# Altium PCB PCB1.PcbDoc
Units mm, origin at the board's own origin, x right, y up, seen from the top; angles counter-clockwise.
Board outline 97 x 70 mm, 2 copper layers (Top Layer, Bottom Layer); 47 components, 61 nets, 268 pads, 166 vias.
Unrouted connection lines stored in the file: 28.
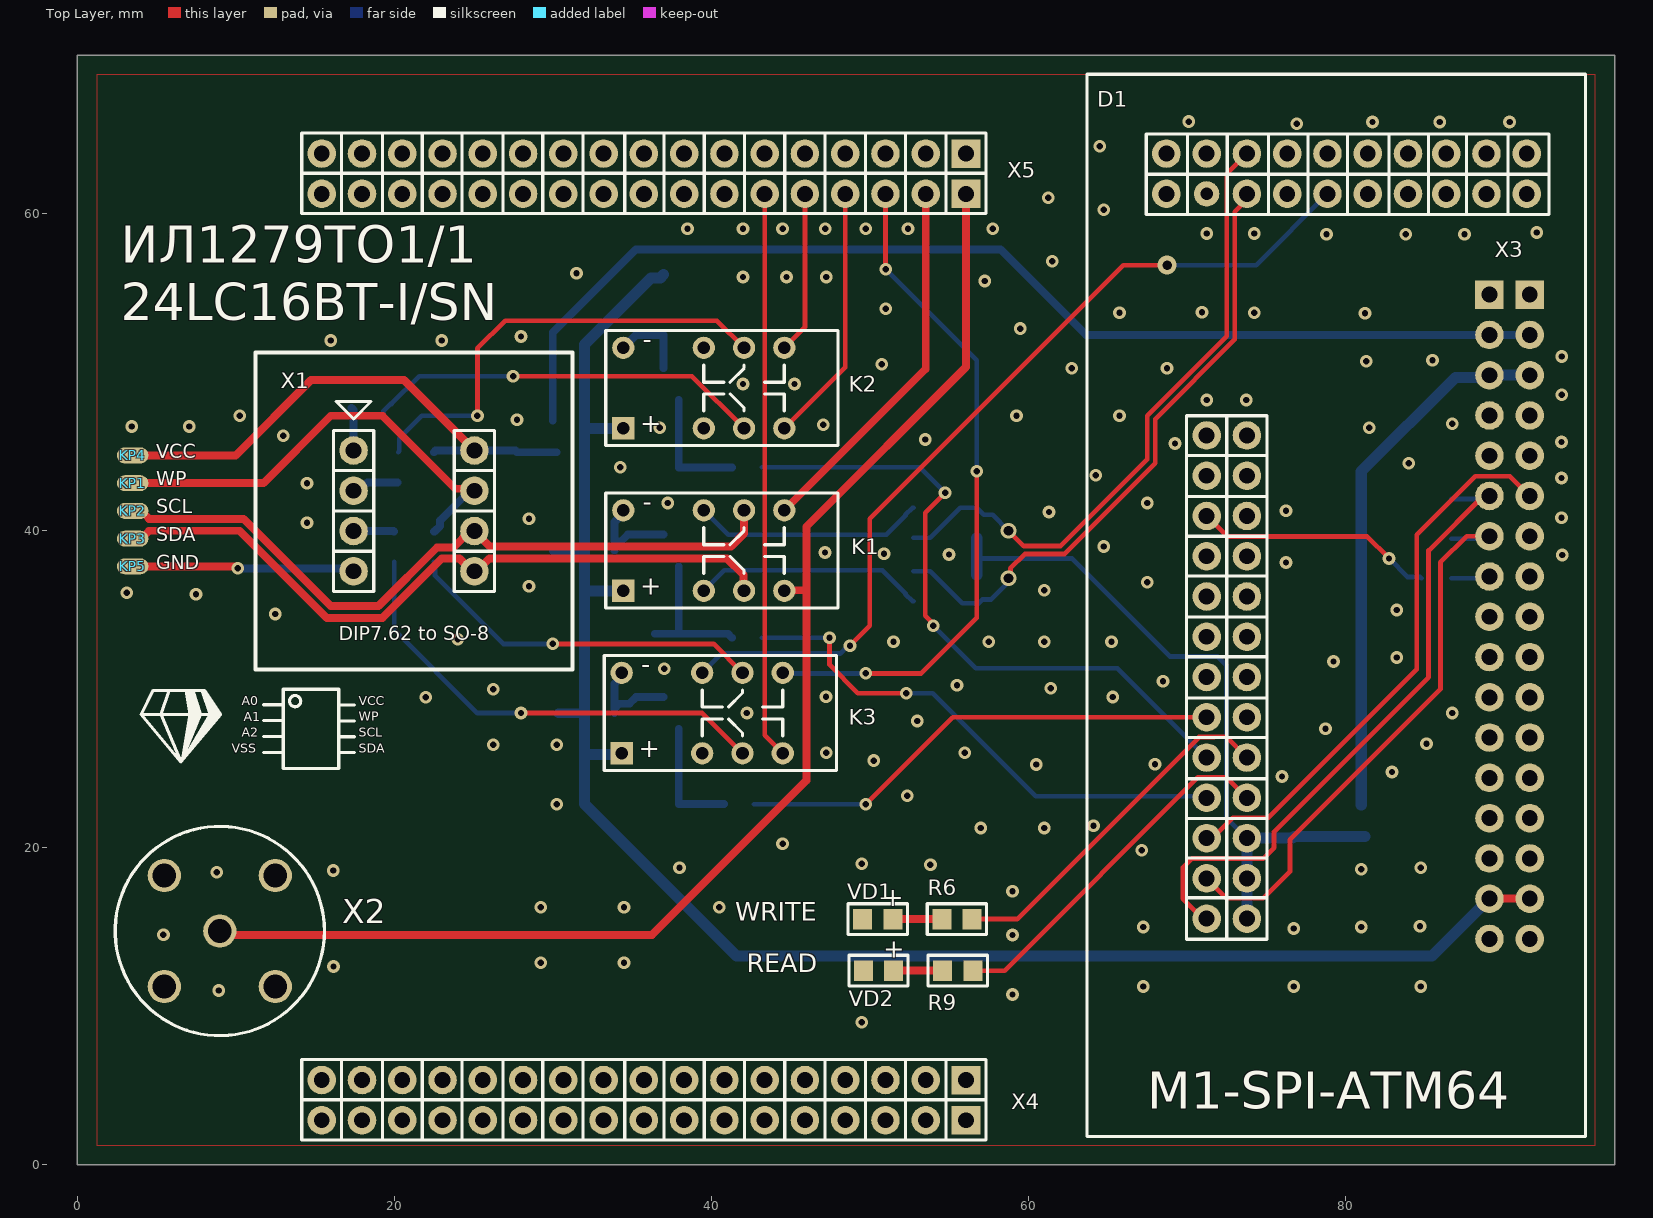
[diagram p0: Top Layer view]
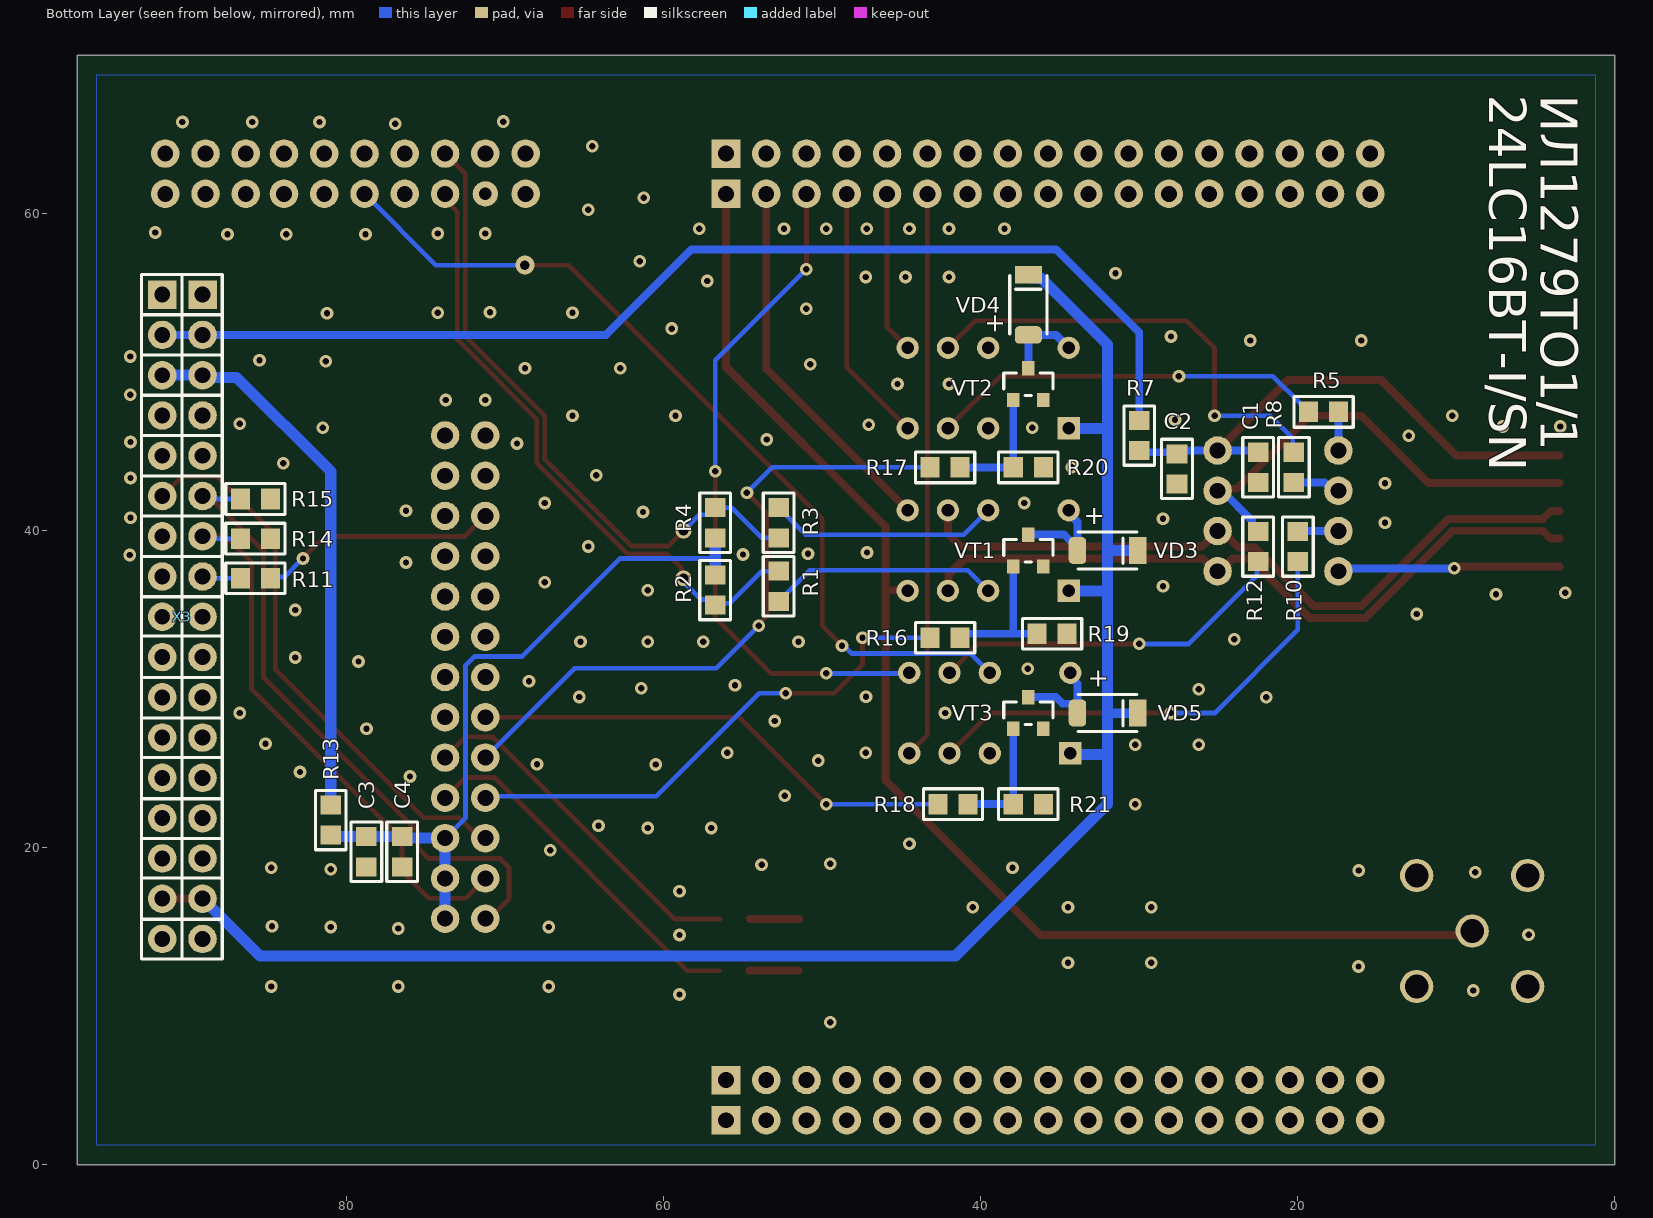
[diagram p1: Bottom Layer view, seen from below]

## Layer stack, top to bottom
Top Solder: solder mask 0.0102, Solder Resist, Dk 3.5
Top Layer: signal copper 0.0356
Dielectric 1: dielectric 0.32, FR-4, Dk 4.8
Bottom Layer: signal copper 0.0356
Bottom Solder: solder mask 0.0102, Solder Resist, Dk 3.5

## Board outline
0,0 97,0 97,70 0,70

## Design rules (kind name [scope] priority, off if disabled: settings)
Clearance [All] p1: gap=0.2 ignorepadtopadclearanceinfootprint=FALSE except(0: Arc-Hole Track-Hole SMDPad-Hole THPad-Hole Via-Hole Fill-Hole Poly-Hole Region-Hole Text-Hole)
ComponentClearance [All] p1: gap=0 collisioncheckmode=3 verticalgap=0 showdistances=FALSE
PolygonConnect PolygonConnect_1 [InNet('GND') AND IsVia] p1: connectstyle=Direct reliefconductorwidth=0.254 reliefentries=4 polygonreliefangle="90 Angle" airgapwidth=0.254
PolygonConnect [All] p2: connectstyle=Relief reliefconductorwidth=0.254 reliefentries=4 polygonreliefangle="90 Angle" airgapwidth=0.254
RoutingVias [All] p1: holewidth=0.6 width=1.2 viastyle="Through Hole" minholewidth=0.4 minwidth=0.8 maxholewidth=1.2 maxwidth=1.8
SilkToSilkClearance [All] p1: silktosilkclearance=0
SilkToSolderMaskClearance [IsPad] p1: minsilkscreentomaskgap=0.1 clearancetoexposedcopper=TRUE
SolderMaskExpansion [All] p1: expansion=0.102 istentingtop=FALSE
Width [All] p1: maxlimit=0.7 minlimit=0.3 preferedwidth=0.3
27 further rules are at their usual default settings.

## Classes and differential pairs
component class Sheet1: C1 C2 C3 C4 D1 K1 K2 K3 KP1 KP2 KP3 KP4 KP5 R1 R2 R3 R4 R5 R6 R7 R8 R9 R10 R11 R12 R13 R14 R15 R16 R17 R18 R19 R20 R21 VD1 VD2 VD3 VD4 VD5 VT1 VT2 VT3 X1 X2
component class "Formula Connector": X3 X4 X5

## Components (designator, comment, footprint, x,y, rotation, side; value= is the part's Value field where it differs from the comment)
C1 "47uF" 0805 22.5,44 r270 bottom
C2 "0.1uF" 0805 27.623,43.904 r270 bottom
C3 "10uF" 0805 78.75,19.75 r270 bottom
C4 "0.1uF" 0805 76.5,19.75 r270 bottom
D1 "M1-SPI-ATM64" M1-SPI-ATM64 71.25,61.25 r0 top locked
K1 "V23079A1001B301 TE" V23079A1001B301 40.75,38.75 r0 top locked
K2 "V23079A1001B301 TE" V23079A1001B301 40.75,49 r0 top locked
K3 "V23079A1001B301 TE" V23079A1001B301 40.65,28.5 r0 top locked
KP1 "Contact" Contact 3.5,43 r180 top
KP2 "Contact" Contact 3.5,41.25 r180 top
KP3 "Contact" Contact 3.5,39.5 r180 top
KP4 "Contact" Contact 3.5,44.75 r180 top
KP5 "Contact" Contact 3.5,37.75 r180 top
R1 "100" 0805 52.75,36.5 r90 bottom
R2 "2k" 0805 56.75,36.25 r90 bottom
R3 "100" 0805 52.75,40.5 r270 bottom
R4 "2k" 0805 56.75,40.5 r270 bottom
R5 "100" 0805 18.375,47.5 r0 bottom
R6 "2.2k" 0805 55.5,15.5 r180 top
R7 "0" 0805 30,46 r270 bottom
R8 "100" 0805 20.25,44 r90 bottom
R9 "2.2k" 0805 55.55,12.25 r180 top
R10 "100" 0805 20,39 r270 bottom
R11 "100" 0805 85.75,37 r180 bottom
R12 "100" 0805 22.5,39 r270 bottom
R13 "1" 0805 81,21.75 r270 bottom
R14 "10k" 0805 85.75,39.5 r180 bottom
R15 "10k" 0805 85.75,42 r180 bottom
R16 "4.7k" 0805 42.25,33.25 r180 bottom
R17 "4.7k" 0805 42.25,44 r180 bottom
R18 "4.7k" 0805 41.75,22.75 r180 bottom
R19 "20k" 0805 35.5,33.5 r180 bottom
R20 "20k" 0805 37,44 r180 bottom
R21 "20k" 0805 37,22.75 r180 bottom
VD1 "LED(0805)" 0805(LED) 50.5,15.5 r180 top
VD2 "LED(0805)" 0805(LED) 50.55,12.25 r180 top
VD3 "LL4148 NXP" SOD80C 32,38.75 r180 bottom
VD4 "LL4148 NXP" SOD80C 37,54.25 r90 bottom
VD5 "LL4148 NXP" SOD80C 32,28.5 r180 bottom
VT1 "MMBT5551L" SOT-23 37,38.75 r180 bottom
VT2 "MMBT5551L" SOT-23 37,49.25 r180 bottom
VT3 "MMBT5551L" SOT-23 37,28.5 r180 bottom
X1 "24LC16BT" "SSOP to DIP8" 21.25,41.25 r0 top locked
X2 "BNC-7038" BNC-7038 9,14.75 r0 top
X3 "PLS34-2.54" PLS34-2.54 89.09,34.57 r90 bottom
X4 "PLS34-2.54" PLS34-2.54 35.75,2.81 r0 top
X5 "PLS34-2.54" PLS34-2.54 35.75,61.25 r0 top

## Footprints (in the part's own frame and the unit in brackets; to place one, negate y for a bottom-side part, rotate by r counter-clockwise, add the part's x,y. Pads: shape width x height; smd on the part's side, far side on the other; paste and mask are expansions set on the pad)
0805 [mm]
  rect 1.2x1.3 smd: 1(-0.95,0) 2(0.95,0)
  silkscreen extent -1.87,-0.97 1.87,0.97, body extent -1.05,-0.63 0.95,0.63, height 0.55
0805(LED) [mm]
  rect 1.2x1.3 smd: 1(-0.95,0) 2(0.95,0)
  silkscreen extent -1.87,-0.97 1.87,0.97, body extent -1.03,-0.41 1.03,0.5, height 0.85
BNC-7038 [mm]
  round 2.1 hole 1.5: 1(0,0) 2(-3.5,-3.5) 2(-3.5,3.5) 2(3.5,-3.5) 2(3.5,3.5)
  silkscreen extent -6.6,-6.6 6.6,6.6, body extent -5.68,-5.68 5.68,5.68, height 21
Contact [mm]
  oval 2x1 smd: 1(0,0)
M1-SPI-ATM64 [mm]
  round 1.8 hole 1: 1(-2.54,2.54) 2(-2.54,0) 3(0,2.54) 5(2.54,2.54) 6(2.54,0) 7(5.08,2.54) 8(5.08,0) 9(7.62,2.54) 10(7.62,0) 11(10.16,2.54) 12(10.16,0) 13(12.7,2.54) 14(12.7,0) 15(15.11,2.54) 16(15.11,0) 17(17.65,2.54) 18(17.65,0) 19(20.19,2.54) 20(20.19,0) 21(0,-15.24) 22(2.54,-15.24) 23(0,-17.78) 24(2.54,-17.78) 25(0,-20.32) 26(2.54,-20.32) 27(0,-22.86) 28(2.54,-22.86) 29(0,-25.4) 30(2.54,-25.4) 31(0,-27.94) 32(2.54,-27.94) 33(0,-30.48) 34(2.54,-30.48) 35(0,-33.02) 36(2.54,-33.02) 37(0,-35.56) 38(2.54,-35.56) 39(0,-38.1) 40(2.54,-38.1) 41(0,-40.64) 42(2.54,-40.64) 43(0,-43.18) 44(2.54,-43.18) 45(0,-45.72) 46(2.54,-45.72)
  round 1.6 hole 0.8: 4(0,0)
  silkscreen extent -7.54,-59.46 23.9,7.54
PLS34-2.54 [mm]
  rect 1.8x1.8 hole 1: 1(20.32,0) 18(20.32,2.54)
  round 1.8 hole 1: 2(17.78,0) 3(15.24,0) 4(12.7,0) 5(10.16,0) 6(7.62,0) 7(5.08,0) 8(2.54,0) 9(0,0) 10(-2.54,0) 11(-5.08,0) 12(-7.62,0) 13(-10.16,0) 14(-12.7,0) 15(-15.24,0) 16(-17.78,0) 17(-20.32,0) 19(17.78,2.54) 20(15.24,2.54) 21(12.7,2.54) 22(10.16,2.54) 23(7.62,2.54) 24(5.08,2.54) 25(2.54,2.54) 26(0,2.54) 27(-2.54,2.54) 28(-5.08,2.54) 29(-7.62,2.54) 30(-10.16,2.54) 31(-12.7,2.54) 32(-15.24,2.54) 33(-17.78,2.54) 34(-20.32,2.54)
  silkscreen extent -21.58,-1.24 21.59,3.84, body extent -19.05,-1.27 21.59,3.84, height 9.2
SOD80C [mm]
  rrect50% 1.1x1.7 smd: 1(-1.9,0)
  rect 1.1x1.7 smd: 2(1.9,0)
  silkscreen extent -1.85,-1.17 1.85,1.17, body extent -1.9,-0.8 1.8,0.8, height 1.55
SOT-23 [mm]
  rect 0.8x0.9 smd: 1(-0.95,-1) 1(-0.95,-1) 2(0.95,-1) 2(0.95,-1) 3(0,1) 3(0,1)
  silkscreen extent -1.55,-0.72 1.55,0.7, body extent -1.5,-1.25 1.5,1.25, height 1.05
"SSOP to DIP8" [mm]
  round 1.8 hole 1: 1(-3.81,3.81) 2(-3.81,1.27) 3(-3.81,-1.27) 4(-3.81,-3.81) 5(3.81,-3.81) 6(3.81,-1.27) 7(3.81,1.27) 8(3.81,3.81)
  silkscreen extent -10,-10 10,10, body extent -5.04,-5.33 5.04,5.33, height 8.5
V23079A1001B301 [mm]
  rect 1.4x1.4 hole 0.8: 1(-6.3,-2.54)
  round 1.4 hole 0.8: 3(-1.22,-2.54) 4(1.32,-2.54) 5(3.86,-2.54) 8(3.86,2.54) 9(1.32,2.54) 10(-1.22,2.54) 12(-6.3,2.54)
  silkscreen extent -7.4,-3.63 7.25,3.63, body extent -7.25,-3.6 7.25,3.6, height 9.4

## Part data
C1 C2 C3 C4: library part C0805, ComponentHeigt=1.3, Firme=AVX, KIND=Конденсатор, Leadform=SMD, Packaging=0805
R1 R2 R3 R4 R5 R6 R7 R8 R9 R10 R11 R12 R13 R14 R15 R16 R17 R18 R19 R20 R21: library part "R0805 Yageo", ComponentHeigt=0.6, Firme=Yageo, KIND=Резистор, Leadform=SMD, Packaging=0805
VD1 VD2: ComponentHeigt=0.75, Firme=Kingbright, KIND="Светодиод L-1154GD Kingbright", Leadform="в отверстия", NN=24003000
VD3 VD4 VD5: Component Link=http://www.nxp.com, ComponentHeigt=1.6, Firme=NXP, KIND="Диод LL4148 NXP", Leadform=SMD, NN=24009301, Packaging=SOD-80C
VT1 VT2 VT3: ComponentHeigt=1.1, Firme=ONS, KIND="Транзистор MMBT5551L*G ONS", Leadform=SMD, NN=24007468, Packaging=SOT-23
X2: ComponentHeigt=5.5, Name=Вилка, Specification="Вилка PLD2-2 *", Typ=PLD2-2

## Via types
v1: diameter 0.8, hole 0.4, Top Layer to Bottom Layer, tented both sides, 163 vias
v2: diameter 1, hole 0.6, Top Layer to Bottom Layer, tented both sides, 2 vias
v3: diameter 1.2, hole 0.6, Top Layer to Bottom Layer, tented both sides, 1 vias

## Nets (pads, with @x,y where several pads share a name; then routed paths per layer and width w, separated by ;. In a path a pad name is that pad's centre, name@x,y a point inside that pad or via, vN(x,y) a via of type N, cw(c..) or ccw(c..) an arc to the next point about the centre after c; other vN are vias at no path point)
+3.3V_24LC: C1.1 C2.1 KP4.1 R7.2 X1.8 | length 33.2
  Top Layer w0.5: KP4.1 10,44.75 14.75,49.5 20.62,49.5 X1.8
  Bottom Layer w0.5: C1.1 22.61,45.06 X1.8 27.64,45.06 27.75,44.95 R7.2@30.25,44.95
+3.3V_MC: C3.1 C4.1 D1.42 D1.44 D1.46 R2.2 R4.2 R13.2 | length 44.9
  Bottom Layer w0.3: 56.75,38.25 62.75,38.25 68.942,32.058 71.942,32.058 72.5,31.5 72.5,21.9 D1.42
  Bottom Layer w0.5: C4.1@76.41,20.61 C4.1
  Bottom Layer w0.7: R2.2 56.75,38.25 R4.2 ; D1.46 D1.44 D1.42 76.41,20.61 C4.1@76.66,20.61 ; C4.1@76.75,20.7 C3.1 79.75,20.7 R13.2@81.25,20.7
+3.3V_VCC: R7.1 X3.2 X3.19 | length 71.6
  Bottom Layer w0.5: R7.1 30,52.5 35.25,57.75 58.25,57.75 63.65,52.35 X3.2 X3.19
+3.3V_VDD: R13.1 X3.3 X3.20 | length 34.2
  Bottom Layer w0.7: R13.1 81,43.723 86.935,49.657 88.937,49.657 X3.3 X3.20
+5V_CONST: K1.1 K2.1 K3.1 VD3.2 VD4.2 VD5.2 X3.16 X3.33 | length 111.8
  Top Layer w0.5: X3.16 X3.33
  Bottom Layer w0.6: VD5.2@30.35,28.5 32,28.5
  Bottom Layer w0.7: VD3.2 32,38.75 ; K3.1 34.27,25.88 32,25.88 ; K1.1 32,36.21 ; K2.1 32,46.46 ; VD4.2 36.8,55.95 36.2,55.95 32,51.75 32,46.46 ; X3.16 85.465,13.165 41.585,13.165 32,22.75 32,25.88 ; 32,25.88 32,28.5 32,36.21 ; 32,36.21 32,38.75 ; 32,38.75 32,46.46
A0: R5.1 X1.1 | length 2.7
  Bottom Layer w0.5: R5.1@17.3,47.75 17.44,47.61 X1.1
A1: R8.1 X1.2 | length 3
  Bottom Layer w0.5: X1.2 17.792,42.52 18.322,43.05 R8.1@20.2,43.05
A2: R10.1 X1.3 | length 2.6
  Bottom Layer w0.5: X1.3 19.97,39.98 R10.1
ADDR0: K2.4 R5.2 | length 25.1
  Top Layer w0.3: v1(27.5,49.75) 38.78,49.75 K2.4
  Bottom Layer w0.3: R5.2 19.325,47.55 19.775,48 19.825,48 21.575,49.75 v1(27.5,49.75)
ADDR0_F: K2.5 X5.4 | length 16.4
  Top Layer w0.3: K2.5 48.45,50.3 X5.4
ADDR1: K2.9 R8.2 | length 28.9
  Top Layer w0.3: v1(25.25,47.25) 25.25,51.5 27,53.25 40.36,53.25 K2.9
  Bottom Layer w0.3: R8.2 20.324,45.024 20.324,45.824 21.75,47.25 v1(25.25,47.25)
ADDR1_F: K2.8 X5.5 | length 10.2
  Top Layer w0.3: K2.8 45.91,52.84 X5.5
ADDR2: K3.4 R10.2 | length 29.5
  Top Layer w0.3: v1(28,28.5) 39.43,28.5 K3.4
  Bottom Layer w0.3: R10.2 20,33.75 25.25,28.5 v1(28,28.5)
ADDR2_F: K3.5 X5.6 | length 35.8
  Top Layer w0.3: X5.6 43.37,27.1 K3.5
DI1_MC: D1.41 X3.23 | length 35.3
  Top Layer w0.3: D1.41 71.61,20.61 72.9,21.9 75.15,21.9 84.5,31.25 84.5,39.75 88.19,43.44 90.38,43.44 X3.23
DO1_MC: D1.45 R15.1 X3.6 | length 40.8
  Top Layer w0.3: D1.45 71,15.53 69.75,16.78 69.75,18.75 70.32,19.32 74.82,19.32 75.5,20 75.5,21 85.25,30.75 85.25,38.75 88.69,42.19 X3.6
  Bottom Layer w0.3: R15.1 88.9,42 X3.6
DO2_MC: D1.43 R14.1 X3.7 | length 36.1
  Top Layer w0.3: D1.43 72.5,16.82 74.82,16.82 76.5,18.5 76.5,20.5 86,30 86,38 87.65,39.65 X3.7
  Bottom Layer w0.3: R14.1 88.94,39.5 X3.7
GND: C1.2 C2.2 C3.2 C4.2 D1.13 D1.15 D1.17 D1.19 D1.20 K2.3 K2.10 K3.3 KP5.1 R14.2 R15.2 R19.2 R20.2 R21.2 VD1.2 VD2.2 VT1.2 VT2.2 VT3.2 X1.4 X2.2 X3.4 X3.21 X5.17 X5.34 | length 14.1
  Top Layer w0.5: KP5.1 10.004,37.75 v1(10.127,37.627)
  Bottom Layer w0.5: v1(10.127,37.627) 17.253,37.627 X1.4
  other v1: 49.5,9 59,10.75 8.925,10.997 67.25,11.25 76.75,11.25 84.75,11.25 16.175,12.513 29.25,12.75 34.5,12.75 5.444,14.52 59,14.5 76.742,14.906 67.25,15 81,15 84.706,15.058 29.25,16.25 34.5,16.25 40.5,16.25 59,17.25 8.802,18.452 16.156,18.569 80.998,18.646 38,18.75 84.75,18.75 53.825,18.937 49.5,19 67.155,19.845 44.5,20.25 57,21.25 61,21.25 64.116,21.384 30.25,22.75 52.373,23.283 76,24.5 82.944,24.778 60.5,25.25 67.991,25.259 50.25,25.5 47.25,26 56,26 26.25,26.5 30.25,26.5 85.119,26.568 78.75,27.5 53,28 42.25,28.5 86.75,28.5 22,29.5 65.328,29.512 47.235,29.537 26.25,30 61.406,30.069 55.5,30.25 68.5,30.5 37.033,31.292 79.25,31.75 83.25,32 51.5,33 57.5,33 61,33 65.25,33 24.009,33.156 12.5,34.75 83.25,35 7.5,36 3.121,36.086 61,36.25 28.5,36.5 67.5,36.75 76.25,38 93.675,38.473 55,38.5 50.895,38.545 47.172,38.63 64.75,39 14.5,40.5 28.5,40.75 93.637,40.822 61.3,41.186 76.25,41.25 37.25,41.75 67.5,41.75 14.5,43 93.637,43.322 64.25,43.5 34.25,44 84,44.25 69.25,45.5 93.637,45.594 53.5,45.75 13,46 36.75,46.5 81.5,46.5 3.438,46.575 7.079,46.575 47.074,46.675 86.75,46.75 27.75,47 10.25,47.25 59.25,47.25 65.75,47.25 71.25,48.25 73.75,48.25 93.656,48.569 42,49.25 45.25,49.25 62.75,50.25 68.75,50.25 50.75,50.5 81.313,50.689 85.5,50.75 93.655,50.991 16,52 23,52 28,52.25 59.5,52.75 81.237,53.709 65.75,53.75 74.25,53.75 70.961,53.789 51,54 57.25,55.75 42,56 44.75,56 47.25,56 31.5,56.25 61.5,57 78.811,58.703 83.806,58.703 87.512,58.703 71.25,58.75 74.25,58.75 92.077,58.811 38.498,59.05 42,59.05 44.5,59.05 47.187,59.05 49.75,59.05 52.406,59.05 57.75,59.05 64.75,60.25 61.25,61 64.5,64.25 76.932,65.671 81.712,65.778 85.954,65.778 90.358,65.778 70.121,65.808
LED1: D1.38 R6.1 | length 22.6
  Top Layer w0.3: R6.1 59.292,15.5 70.772,26.98 71.73,26.98 71.75,27 72.48,27 D1.38
LED2: D1.40 R9.1 | length 22.9
  Top Layer w0.3: R9.1 58.5,12.25 70.69,24.44 72.5,24.44 D1.40
NetK1_3: K1.3 R1.1 | length 14.6
  Bottom Layer w0.3: K1.3 40.82,37.5 50.8,37.5 52.25,36.05 52.25,36 52.7,35.55 R1.1
NetK1_10: K1.10 R3.1 | length 14.6
  Bottom Layer w0.3: K1.10 41.07,39.75 51.05,39.75 52.25,40.95 52.25,41 52.7,41.45 R3.1
NetK1_12: K1.12 VD3.1 VT1.3 | length 6.4
  Bottom Layer w0.5: K1.12 34.45,41.097 33.9,40.547 VD3.1 33.9,39.036 34.198,39.335 34.32,39.335 34.735,39.75 35.75,39.75 VT1.3@37,39.75
NetK2_12: K2.12 VD4.1 VT2.3 | length 5
  Bottom Layer w0.5: K2.12 35.26,52.35 VD4.1 VT2.3@37,50.25
NetK3_12: K3.12 VD5.1 VT3.3 | length 6.1
  Bottom Layer w0.5: VD5.1 33.9,30.346 34.35,30.796 K3.12 ; VD5.1@33.9,28.786 34.198,29.085 34.835,29.085 35.25,29.5 VT3.3@37,29.5
NetR6_2: R6.2 VD1.1 | length 3.1
  Top Layer w0.5: VD1.1 R6.2
NetR9_2: R9.2 VD2.1 | length 3.1
  Top Layer w0.5: VD2.1 R9.2
NetR16_2: R16.2 R19.1 VT1.1 | length 9.2
  Bottom Layer w0.5: R19.1 37.95,33.5 ; VT1.1@37.95,37.75 37.95,33.5 ; R16.2 41.05,33.5 37.95,33.5
NetR17_2: R17.2 R20.1 VT2.1 | length 7.6
  Bottom Layer w0.5: VT2.1@37.95,48.25 R20.1 R17.2
NetR18_2: R18.2 R21.1 VT3.1 | length 7.6
  Bottom Layer w0.5: VT3.1@37.95,27.5 R21.1 R18.2
NetX5_18: X5.18
NetX5_19: X5.19
NetX5_20: X5.20
NetX5_21: X5.21
NetX5_22: X5.22
NetX5_23: X5.23
NetX5_24: X5.24
NetX5_25: X5.25
NetX5_26: X5.26
NetX5_27: X5.27
NetX5_28: X5.28
NetX5_29: X5.29
NetX5_30: X5.30
NetX5_31: X5.31
NetX5_32: X5.32
NetX5_33: X5.33
ON_RELE1: D1.39 R16.1 | length 33.2
  Top Layer w0.3: v1(47.462,33.25) 47.462,31.538 49.25,29.75 v1(52.298,29.75)
  Bottom Layer w0.3: R16.1 v1(47.462,33.25) ; v1(52.298,29.75) 53.97,29.75 60.47,23.25 71.15,23.25 D1.39
ON_RELE2: D1.37 R17.1 | length 42
  Top Layer w0.3: v1(54,34) 54,34.135 53.5,34.635 53.5,41.138 v1(54.75,42.388)
  Bottom Layer w0.3: R17.1 53.138,44 v1(54.75,42.388) ; v1(54,34) 56.678,31.322 65.618,31.322 D1.37
ON_RELE3: D1.35 R18.1 | length 30.8
  Top Layer w0.3: v1(49.75,22.75) 55.23,28.23 D1.35
  Bottom Layer w0.3: R18.1 v1(49.75,22.75)
RST_IN: R11.1 X3.8 | length 2.6
  Top Layer w0.3: X3.8@88.98,37 X3.8
  Bottom Layer w0.3: R11.1 88.98,37 X3.8
RST_MC: D1.25 R11.2 | length 15.2
  Top Layer w0.3: D1.25 72.54,39.64 81.363,39.64 v1(82.753,38.25)
  Bottom Layer w0.3: v1(82.753,38.25) 83.926,37.077 84.723,37.077 R11.2
SCL: K1.9 KP2.1 X1.6 | length 45.2
  Top Layer w0.5: KP2.1 4.043,41.25 4.543,40.75 10.5,40.75 16,35.25 19.01,35.25 22.71,38.95 23.757,38.95 24.787,39.98 X1.6 26.036,39.004 41.254,39.004 42.07,39.82 K1.9
SCL_F: K1.8 X5.2 | length 23.7
  Top Layer w0.5: K1.8 53.53,50.21 X5.2
SCL_MC: D1.5 R3.2 R4.1 | length 40.7
  Top Layer w0.3: v2(58.75,40) 59.722,39.028 62.028,39.028 67.5,44.5 67.5,47.25 72.52,52.27 72.52,62.52 D1.5
  Bottom Layer w0.3: R3.2 53.8,39.55 55.7,41.45 R4.1 57.2,41 57.75,41 v2(58.75,40)
SDA: K1.4 KP3.1 X1.5 | length 44.6
  Top Layer w0.5: KP3.1 4.043,39.5 4.543,40 10.25,40 15.75,34.5 19.25,34.5 23,38.25 24.117,38.25 24.927,37.44 X1.5 ; X1.5@25.193,37.44 26.003,38.25 41,38.25 42.03,37.22 42.03,36.25 K1.4
SDA_F: K1.5 X2.1 X5.1 | length 83.7
  Top Layer w0.5: X2.1 9.25,14.5 36.25,14.5 46,24.25 46,36.25 ; K1.5 46,36.25 ; X5.1 56.07,50.32 46,40.25 46,36.25
SDA_MC: D1.6 R1.2 R2.1 | length 39.7
  Top Layer w0.3: v2(58.75,37) 58.869,37.119 58.869,37.624 59.774,38.528 62.278,38.528 68,44.25 68,47.043 73.02,52.063 73.02,60.111 73.795,60.886 D1.6@73.795,61.245
  Bottom Layer w0.3: R1.2 53.8,37.45 55.826,35.424 56.626,35.424 R2.1 57.118,35.668 57.668,35.668 58.75,36.75 v2(58.75,37)
WP: KP1.1 R12.1 X1.7 | length 29.1
  Top Layer w0.5: KP1.1 11.75,43 16,47.25 19.25,47.25 23.853,42.647 24.933,42.647 X1.7
  Bottom Layer w0.5: R12.1 22.55,39.95 22.9,40.3 22.9,40.65 24.77,42.52 X1.7
WP_F: K3.8 X5.3 | length 42.8
  Top Layer w0.3: v1(49.75,31) 53.25,31 56.75,34.5 v1(56.75,43.75) ; X5.3 50.99,56.51 v1(51,56.5)
  Bottom Layer w0.3: K3.8 44.55,31 v1(49.75,31) ; v1(51,56.5) 56.75,50.75 v1(56.75,43.75)
WP_MC: D1.10 K3.10 | length 56.3
  Top Layer w0.3: v1(48.75,32.75) 50,34 50,40.75 66,56.75 v3(68.75,56.75) ; D1.10@78.583,61.537 D1.10
  Bottom Layer w0.3: K3.10 40.64,32.25 48.124,32.25 48.624,32.75 v1(48.75,32.75) ; v3(68.75,56.75) 74.37,56.75 D1.10
WPP: K3.9 R12.2 | length 22.8
  Top Layer w0.3: v1(30,32.862) 40.148,32.862 K3.9
  Bottom Layer w0.3: R12.2 22.574,37.976 22.574,37.176 26.888,32.862 v1(30,32.862)
pads on no net: D1.1 D1.2 D1.3 D1.4 D1.7 D1.8 D1.9 D1.11 D1.12 D1.14 D1.16 D1.18 D1.21 D1.22 D1.23 D1.24 D1.26 D1.27 D1.28 D1.29 D1.30 D1.31 D1.32 D1.33 D1.34 D1.36 X3.1 X3.5 X3.9 X3.10 X3.11 X3.12 X3.13 X3.14 X3.15 X3.17 X3.18 X3.22 X3.24 X3.25 X3.26 X3.27 X3.28 X3.29 X3.30 X3.31 X3.32 X3.34 X4.1 X4.2 X4.3 X4.4 X4.5 X4.6 X4.7 X4.8 X4.9 X4.10 X4.11 X4.12 X4.13 X4.14 X4.15 X4.16 X4.17 X4.18 X4.19 X4.20 X4.21 X4.22 X4.23 X4.24 X4.25 X4.26 X4.27 X4.28 X4.29 X4.30 X4.31 X4.32 X4.33 X4.34 X5.7 X5.8 X5.9 X5.10 X5.11 X5.12 X5.13 X5.14 X5.15 X5.16

## Polygon pours and split planes (outlines as drawn)
GND on Bottom Layer "NONET_L-01_P-001" (solid, remove dead copper, shelved, pour order 1): 1.25,68.75 1.25,1.25 95.75,1.25 95.75,68.75
GND on Top Layer "NONET_L-01_P-001" (solid, remove dead copper, shelved, pour order 0): 1.25,68.75 1.25,1.25 95.75,1.25 95.75,68.75

## Other copper
Top Layer:
  pour cut-out: 23.855,45.291 23.826,43.146 24.154,43.146
  pour cut-out: 53.502,30.748 52.886,30.748 52.886,29.634
  pour cut-out: 70,22.296 70,19.32 70.32,19.32
  pour cut-out: 73.75,63 73.75,61.75 73.25,61.75
  pour cut-out: 40.81,37.791 41.5,37.791 41.5,36.5
  pour cut-out: 46.313,34 49.687,34 49.687,33.56
  pour cut-out: 49.344,32.839 49.344,31.433 50.183,31.433
  pour cut-out: 58.251,39.582 58.251,37.499 58.527,37.562
  pour cut-out: 47.462,33.25 46,33.25 46,31 47.5,31
  pour cut-out: 47.696,33.815 47.462,33.25 47.462,32.394 48.25,31 49.75,31 48.75,32.75
  pour cut-out: 55,16.401 56,16.401 56,14.651 55,14.651
  pour cut-out: 50.454,11.4 50.7,11.4 50.7,13.154 50.454,13.154
  pour cut-out: 50.404,16.404 50.404,14.65 50.65,14.65 50.65,16.35
  pour cut-out: 21.75,36.5 25.06,36.5 25.06,37.44
  pour cut-out: 50.233,31.357 52.868,31.357 52.868,29.516
  pour cut-out: 44.499,26.963 41.467,26.963 41.97,25.052 45.599,25.052
  pour cut-out: 41.97,31.948 44.5,31.948 44.5,30.132 41.97,30.132
  pour cut-out: 42.07,36.21 44.61,36.21 44.61,35.302 42.07,35.302
  pour cut-out: 42.07,42.198 44.631,42.198 44.631,41.29 42.07,41.29
  pour cut-out: 42.07,47.368 44.61,47.368 44.61,45.552 42.07,45.552
  pour cut-out: 41.835,52.448 41.835,50.75 45,50.75 45,52.448
  pour cut-out: 57.17,64.89 53.53,64.89 53.53,60.15 57.17,60.15
  pour cut-out: 76.252,17.748 74.751,17.5 74.751,14.975
  pour cut-out: 71.537,14.458 73.75,14.458 73.75,17.25
  pour cut-out: 89.25,39 91.75,39 91.75,40.25
  pour cut-out: 89.5,40 91.75,40 91.75,41.75
  pour cut-out: 88.75,41.5 88.75,39.25 86.75,39.25
  pour cut-out: 89.5,43.25 89.5,41.118 91.343,41.118
  pour cut-out: 89.875,45.515 91.75,45.515 91.75,43
  pour cut-out: 70,24.25 70,22 71,22
  pour cut-out: 71.25,26.799 71.25,24.5 73.79,24.5 73.79,26.799
  pour cut-out: 71.75,24.5 71.75,22 74.899,22 74.899,25.69
  pour cut-out: 55.25,13.103 56,13.103 56,11.389 55.25,11.389
  pour cut-out: 23.623,39.25 23.623,36.68 24.307,37.057 26,38.75
  pour cut-out: 22,47.5 26.169,42.52 26.169,45.06
Bottom Layer:
  pour cut-out: 34.35,31.04 34.35,29.5 37,29.5
  pour cut-out: 34.45,41.194 34.45,39.75 37,39.75
  pour cut-out: 55.2,42.962 55.2,41.45 56.75,41.45
  pour cut-out: 53.526,42.176 55.2,42.962 54.287,43.356
  pour cut-out: 39.43,30.132 44.55,30.132 44.55,31
  pour cut-out: 40,41.525 44.61,41.525 44.61,40 44.75,40
  pour cut-out: 20.125,47.795 20.125,46.625 20.875,46.625
  pour cut-out: 59.5,38 59.5,36.75 58.75,36.75
  pour cut-out: 58.75,40 59.5,40 59.5,38.554
  pour cut-out: 85.654,42.904 85.654,41.15 85.9,41.15 85.9,42.85
  pour cut-out: 85.654,40.404 85.654,38.65 85.896,38.65 85.896,40.404
  pour cut-out: 80.15,21.9 80.15,21.6 81.85,21.6 81.85,21.9
  pour cut-out: 75.65,20.049 75.65,19.654 79.75,19.654 79.75,20.139
  pour cut-out: 29.15,46.15 29.15,45.85 30.85,45.85 30.85,46.15
  pour cut-out: 26.719,43.808 26.719,44.601 28.527,44.601 28.527,43.808
  pour cut-out: 21.65,44.15 21.65,43.7 23.404,43.7 23.404,43.904 23.404,44.15
  pour cut-out: 36.904,23.654 36.904,21.851 37.54,21.851 37.54,23.65
  pour cut-out: 36.904,44.904 36.904,43.15 37.491,43.15 37.491,44.904
  pour cut-out: 35.404,34.404 35.404,32.65 36,32.65 36,34.404
  pour cut-out: 42.1,34.1 42.4,34.1 42.4,32.607
  pour cut-out: 42.1,34.1 42.1,32.607 42.4,32.607
  pour cut-out: 46.45,33.5 48.75,30.683 48.75,33.5
  pour cut-out: 51.9,34.701 51.9,34.5 57.6,34.5
  pour cut-out: 71.25,40.93 73.79,40.93 73.79,38.39
  pour cut-out: 89.09,15.681 89.09,13.5 86.5,13.5
  pour cut-out: 55.9,36.682 55.9,36 56.25,36
  pour cut-out: 55.9,40.842 55.9,40.218 57.936,40.218
  pour cut-out: 51.9,41.148 51.9,40.25 52.25,40.25
  pour cut-out: 51.9,37.076 51.9,36.25 52.25,36.25
  pour cut-out: 71.25,25.69 71.25,20.61 73.795,20.61 73.795,25.69
  pour cut-out: 71.25,28.23 70.25,28.23 70.25,27.25
  pour cut-out: 71.25,31.75 71.25,25.69 73.795,25.69 73.795,31.758
  pour cut-out: 85.6,37.85 85.9,37.85 85.9,36.15 85.6,36.15
  pour cut-out: 70.963,41.064 70.963,38.39 74.091,38.39
  pour cut-out: 41.6,23.6 41.9,23.6 41.9,21.9 41.6,21.9
  pour cut-out: 42.1,44.85 42.4,44.85 42.4,43.15 42.1,43.15
  pour cut-out: 21.65,39.15 21.65,38.85 23.35,38.85 23.35,39.15
  pour cut-out: 19.15,39.15 19.15,38.85 20.85,38.85 20.85,39.15
  pour cut-out: 29.4,44.15 29.4,43.85 30.884,43.85 30.884,44.15 30.835,44.15
  pour cut-out: 19.4,44.25 21.1,44.25 21.1,43.85 19.4,43.85 19.4,44.15
  pour cut-out: 17.914,48.35 19.136,48.35 19.031,46.646 18.042,46.646

## Silkscreen, mask and mechanical layers (free items; w line width, h text height)
Top Overlay:
  circle w0.2: c13.75,29.25 r0.354
  region: 8.295,28.416 9.045,28.416 8.045,29.916 7.795,29.916
  region: 7.795,28.416 7.045,28.416 6.795,29.916 7.295,29.916
  region: 9.045,28.416 6.545,25.416 8.295,28.416
  region: 6.545,25.416 7.045,28.416 7.795,28.416
  lines w0.2: 5.795,29.916 5.295,28.416 6.545,25.416 ; 7.295,29.916 7.795,28.416 6.545,25.416 ; 11.75,26.019 12.885,26.019 ; 11.75,27.019 12.885,27.019 ; 11.75,28.019 12.885,28.019 ; 11.75,29.019 12.885,29.019 ; 16.5,26 17.5,26 ; 16.5,27 17.5,27 ; 16.5,28 17.5,28 ; 16.5,29 17.5,29 ; 4.045,28.416 9.045,28.416 ; 4.045,28.416 4.795,29.916 8.045,29.916 9.045,28.416 ; 4.045,28.416 6.545,25.416 ; 6.545,25.416 9.045,28.416 ; 13,25 16.5,25 16.5,30 13,30 13,25
  text "ИЛ1279ТО1/1" at 2.75,56.119 h4
  text "24LC16BT-I/SN" at 2.75,52.493 h4
  text "VCC" at 5,44.267 h1.5
  text "WP" at 5,42.544 h1.5
  text "SCL" at 5,40.785 h1.5
  text "SDA" at 5,39.027 h1.5
  text "GND" at 5,37.268 h1.5
  text "DIP7.62 to SO-8" at 16.5,32.768 h1.5
  text "A0" at 10.396,28.762 h1
  text "VCC" at 17.75,28.761 h1
  text "A1" at 10.498,27.769 h1
  text "WP" at 17.75,27.777 h1
  text "A2" at 10.397,26.776 h1
  text "SCL" at 17.75,26.77 h1
  text "VSS" at 9.75,25.762 h1
  text "SDA" at 17.75,25.762 h1
  text "WRITE" at 41.5,15 h2
  text "READ" at 42.25,11.75 h2
Bottom Overlay:
  text "ИЛ1279ТО1/1" at 5.452,67.5 h4 r90
  text "24LC16BT-I/SN" at 8.702,67.5 h4 r90
Board:
  the board outline again, w0.3

## Dimensions
97,70 to 97,0 on Mechanical 13
0,70 to 97,70 on Mechanical 13

## Text inside footprints (layer, text, board x,y; h text height)
K1: Top Overlay "+" at 35.53,35.55 h2; Top Overlay "-" at 35.68,40.86 h2
K2: Top Overlay "+" at 35.53,45.8 h2; Top Overlay "-" at 35.68,51.11 h2
K3: Top Overlay "+" at 35.43,25.3 h2; Top Overlay "-" at 35.58,30.61 h2
VD1: Top Overlay "+" at 52.146,17.734 h2 r180
VD2: Top Overlay "+" at 52.196,14.484 h2 r180
VD3: Bottom Overlay "+" at 33.5,40 h2
VD4: Bottom Overlay "+" at 38.17,52.4 h2 r270
VD5: Bottom Overlay "+" at 33.25,29.75 h2